# Altium PCB 24V-10A-Power-Board-v1.0.PcbDoc (part 3 of 5)
Units mil, origin at the board's own origin, x right, y up, seen from the top; angles counter-clockwise.
Board outline 6000 x 4000 mil, 2 copper layers (Top Layer, Bottom Layer); 609 components, 307 nets, 1491 pads, 0 vias.
Unrouted connection lines stored in the file: 1132.
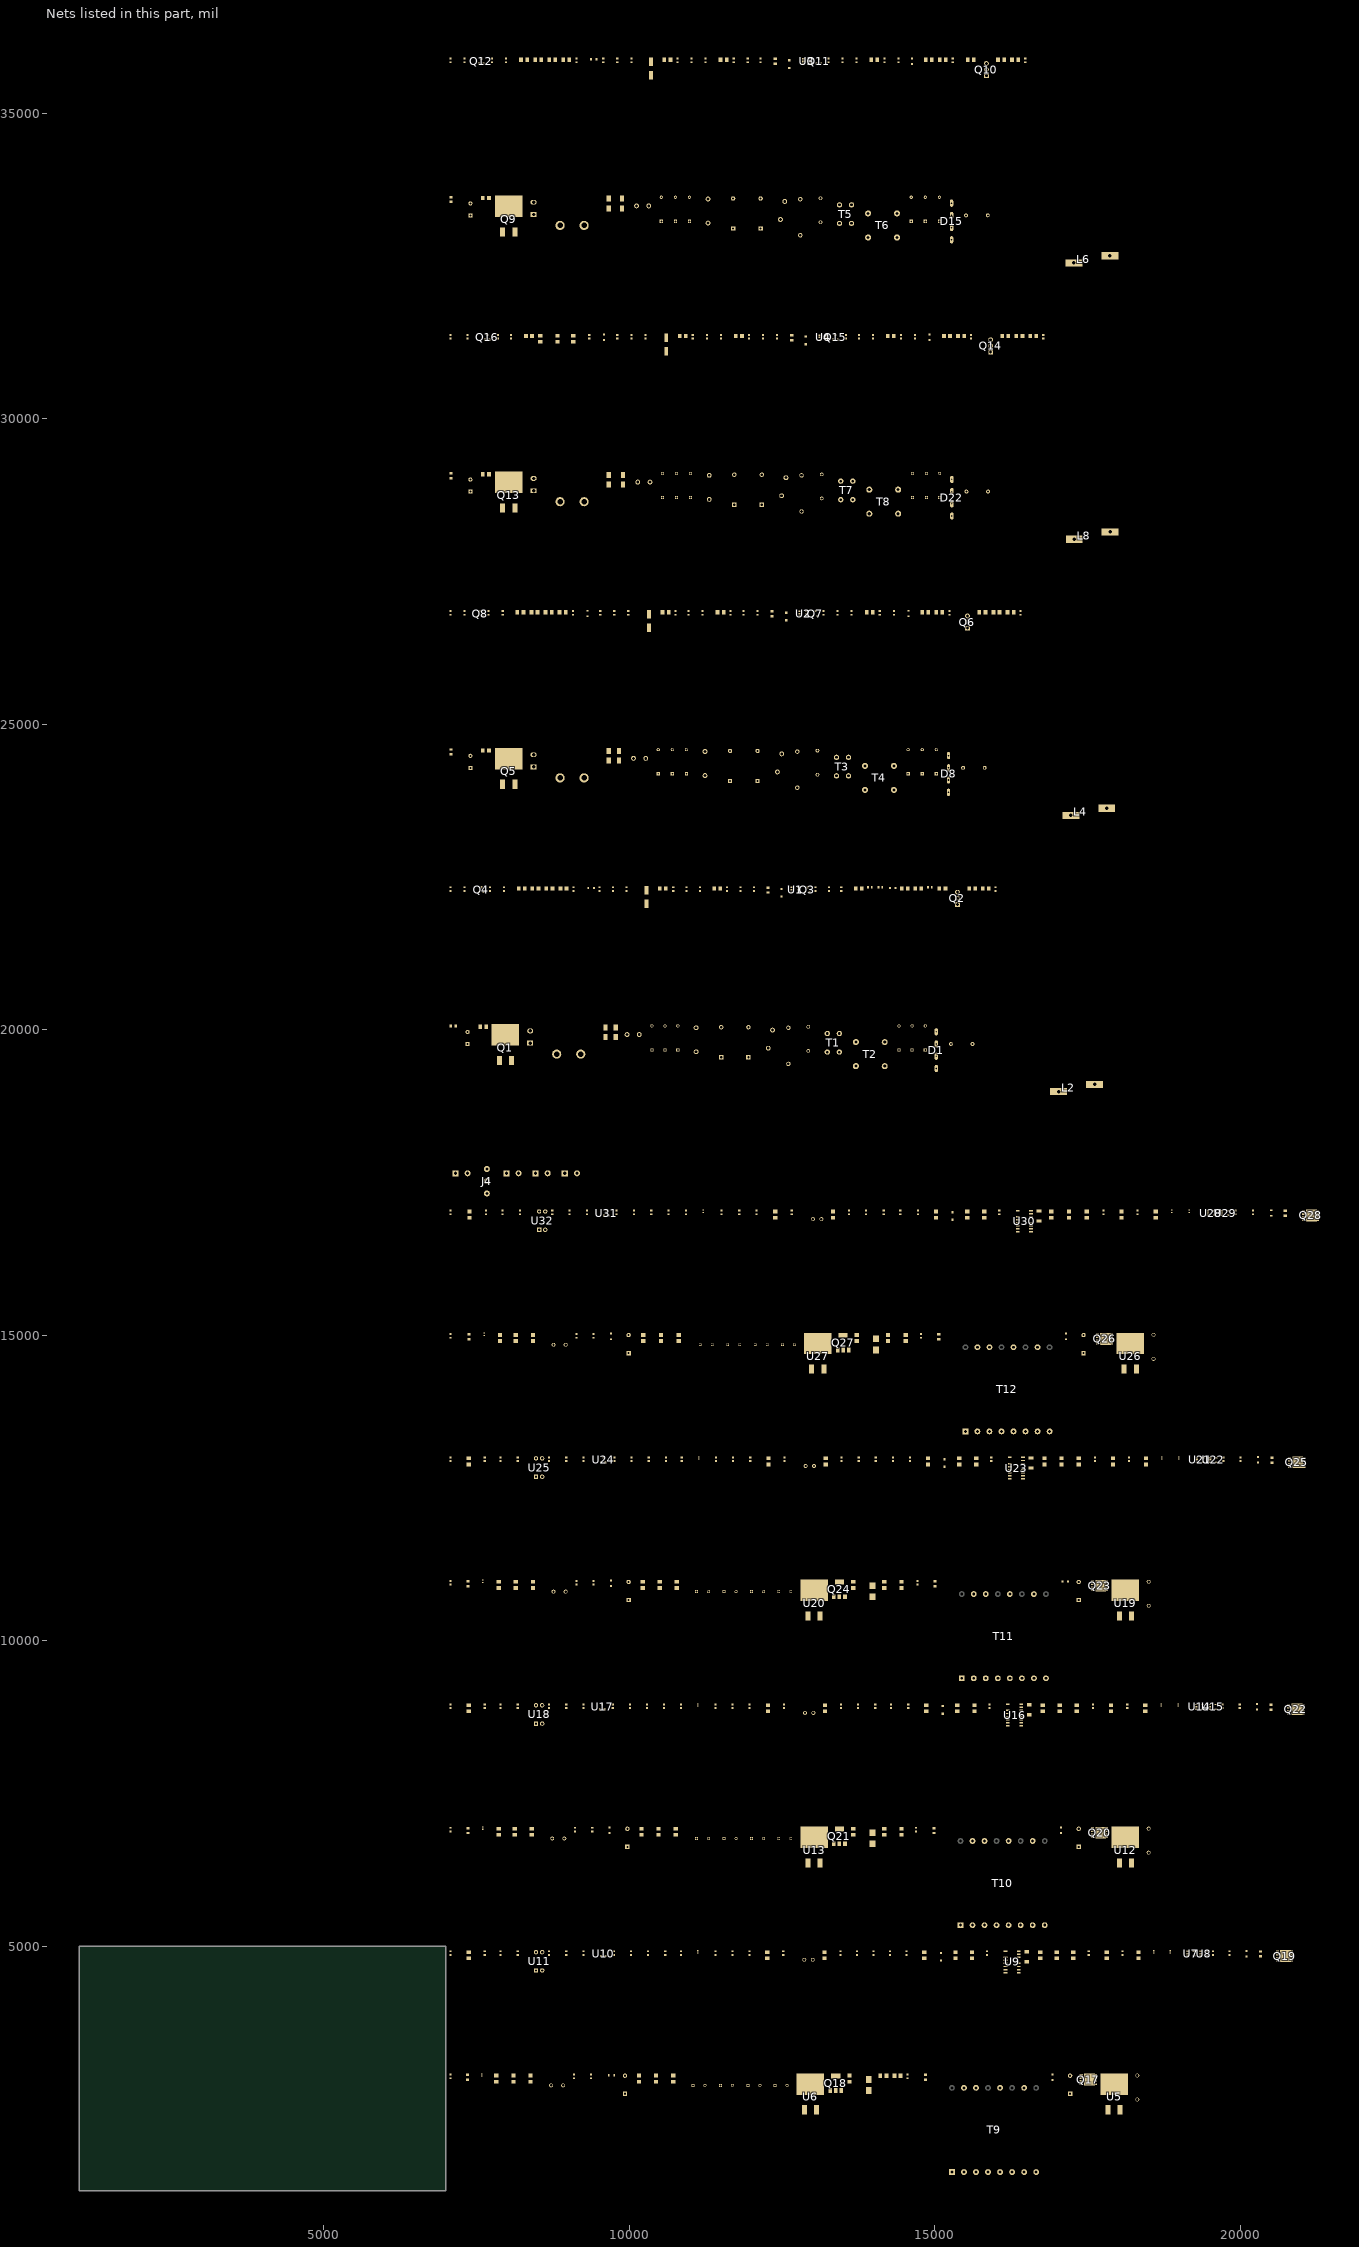
[diagram p2: the nets of this part, all layers, seen from the top]

## Part data (continued)
D4 D11 D18 D25: "DIODE GEN PURP 600V 8A TO220FPAC", LCSC Part Number=C77956, Manufacturer=STMicroelectronics, ComponentLink1Description=https://datasheet.ciiva.com/4455/cd00002721-110256-4455363.pdf?src-supplier=Mouser, ComponentLink1URL=https://datasheet.ciiva.com/4455/cd00002721-110256-4455363.pdf?src-supplier=Mouser, ComponentLink2Description=https://datasheet.ciiva.com/7964/1522573-7964086.pdf?src-supplier=Element14, ComponentLink2URL=https://datasheet.ciiva.com/7964/1522573-7964086.pdf?src-supplier=Element14, ComponentLink3Description=https://datasheet.ciiva.com/917/cd00002721-917751.pdf?src-supplier=Digikey, ComponentLink3URL=https://datasheet.ciiva.com/917/cd00002721-917751.pdf?src-supplier=Digikey, ComponentLink4Description=https://datasheet.ciiva.com/14169/cd00002721-14169005.pdf?src-supplier=Distrelec, ComponentLink4URL=https://datasheet.ciiva.com/14169/cd00002721-14169005.pdf?src-supplier=Distrelec, Item Type=Diode, Manufacturer Part Number=STTH8L06FP, Pricing="1=0.8, 10=0.793, 50=0.793, 100=0.793, 1000=0.673, 10000=0.377 (USD)", RoHS=Yes, Stock=2675, Supplier=Mouser
D5 D7 D12 D14 D19 D21 D26 D28 D29 D31 D35 D37 D41 D43 D47 D49: "100V 1V@10mA 4ns 200mA SOD-323 Switching Diodes ROHS", LCSC Part Number=C668970, Manufacturer=MCC, ComponentLink1Description=https://datasheet.ciiva.com/6367/mmdl914sod-323-6367364.pdf?src-supplier=Digikey, ComponentLink1URL=https://datasheet.ciiva.com/6367/mmdl914sod-323-6367364.pdf?src-supplier=Digikey, ComponentLink2Description=https://datasheet.ciiva.com/24097/mmdl914sod-323-24097719.pdf?src-supplier=Mouser, ComponentLink2URL=https://datasheet.ciiva.com/24097/mmdl914sod-323-24097719.pdf?src-supplier=Mouser, ComponentLink3Description=https://datasheet.ciiva.com/6367/mmdl914sod-323-6367366.pdf?src-supplier=Digikey, ComponentLink3URL=https://datasheet.ciiva.com/6367/mmdl914sod-323-6367366.pdf?src-supplier=Digikey, ComponentLink4Description=https://datasheet.ciiva.com/6367/mmdl914sod-323-6367368.pdf?src-supplier=Digikey, ComponentLink4URL=https://datasheet.ciiva.com/6367/mmdl914sod-323-6367368.pdf?src-supplier=Digikey, Item Type=Diode, Manufacturer Part Number=MMDL914-TP, Pricing="1=0.15, 10=0.108, 100=0.0585, 500=0.04594, 1000=0.03191 (USD)", RoHS=Yes, Stock=172971, Supplier=Digikey
D6 D13 D20 D27: "100V 400mW Single 1.25V@150mA 8ns 300mA SOD-123 Switching Diode ROHS", LCSC Part Number=C917030, Manufacturer=JSMSEMI, Package=SOD-123, ComponentLink1Description=LCSC, ComponentLink1URL=https://www.lcsc.com/product-detail/Switching-Diode_JSMSEMI-1N4148W_C917030.html, Item Type=Diode, Manufacturer Part Number=1N4148W
D30 D36 D42 D48: "DIODE SCHOTTKY 60V 1A SMB", Average Rectified Current=1A, Case/Package=SMB, LCSC Part Number=C5268303, Manufacturer=STMicroelectronics, Max Reverse Voltage (DC)=60V, Package Quantity=1, ComponentLink1Description=https://datasheet.ciiva.com/6380/dm00058656-6380741.pdf?src-supplier=Digikey, ComponentLink1URL=https://datasheet.ciiva.com/6380/dm00058656-6380741.pdf?src-supplier=Digikey, Item Type=Diode, Manufacturer Part Number=STPS160UY, Mounting Technology="Surface Mount", Packaging="Tape and Reel", Pricing="1=0.46, 10=0.458, 50=0.458, 100=0.458, 1000=0.314, 10000=0.107 (USD)", RoHS=Yes, RoHS Compliant=Yes, Series=-, Stock=2181, Supplier=Mouser
D32 D38 D44 D50: "19V~21V 200mW 20V SOD-323-2 Zener Diodes ROHS", LCSC Part Number=C508233, Manufacturer=Diodes, ComponentLink1Description=https://datasheet.ciiva.com/896/ds31038-896169.pdf?src-supplier=Digikey, ComponentLink1URL=https://datasheet.ciiva.com/896/ds31038-896169.pdf?src-supplier=Digikey, ComponentLink2Description=https://datasheet.ciiva.com/896/ds31038-896170.pdf?src-supplier=Digikey, ComponentLink2URL=https://datasheet.ciiva.com/896/ds31038-896170.pdf?src-supplier=Digikey, ComponentLink3Description=https://datasheet.ciiva.com/896/ds31038-896171.pdf?src-supplier=Digikey, ComponentLink3URL=https://datasheet.ciiva.com/896/ds31038-896171.pdf?src-supplier=Digikey, ComponentLink4Description=https://datasheet.ciiva.com/10640/ds31038-10640197.pdf?src-supplier=Avnet, ComponentLink4URL=https://datasheet.ciiva.com/10640/ds31038-10640197.pdf?src-supplier=Avnet, Item Type=Diode, Manufacturer Part Number=MMSZ5250BS-7-F, Pricing="3000=0.0292, 9000=0.0281, 15000=0.0276, 60000=0.0263, 90000=0.0255 (USD)", RoHS=Yes, Stock=3000, Supplier="Future Electronics"
D33 D39 D45 D51: "DIODE GEN PURP 600V 1A DO214AD", Forward Current=1A, LCSC Part Number=C896698, Manufacturer="ON Semiconductor / Fairchild", Max Reverse Current=1uA, Reverse Voltage=600V, ComponentLink1Description=http://www.farnell.com/datasheets/2572314.pdf?src-supplier=Farnell, ComponentLink1URL=http://www.farnell.com/datasheets/2572314.pdf?src-supplier=Farnell, ComponentLink2Description=http://www.farnell.com/datasheets/2572314.pdf?src-supplier=Newark, ComponentLink2URL=http://www.farnell.com/datasheets/2572314.pdf?src-supplier=Newark, ComponentLink3Description=http://www.farnell.com/datasheets/2572314.pdf?src-supplier=Element14, ComponentLink3URL=http://www.farnell.com/datasheets/2572314.pdf?src-supplier=Element14, ComponentLink4Description=https://www.onsemi.com/pub/Collateral/ES1JAF-D.PDF?src-supplier=Digikey, ComponentLink4URL=https://www.onsemi.com/pub/Collateral/ES1JAF-D.PDF?src-supplier=Digikey, ComponentLink5Description=https://www.fairchildsemi.com/datasheets/ES/ES1DAF.pdf?src-supplier=Digikey, ComponentLink5URL=https://www.fairchildsemi.com/datasheets/ES/ES1DAF.pdf?src-supplier=Digikey, Height=1.1mm, Item Type=Diode, Manufacturer Part Number=ES1JAF, Pricing="1=0.66, 10=0.443, 100=0.3026, 500=0.23836, 1000=0.21716, 2000=0.19913, 5000=0.17939 (USD)", RoHS=Yes, Stock=35994, Supplier=Digikey
D34 D40 D46 D52: "DIODE GEN PURP 100V 300MA SOD123", Average Rectified Current=300mA, Current Rating=150mA, Forward Voltage=1.25V, LCSC Part Number=C83528, Manufacturer=Diodes, Max Forward Surge Current (Ifsm)=2A, Max Operating Temperature=150°C, Max Repetitive Reverse Voltage (Vrrm)=100V, Max Reverse Current=1uA, Min Operating Temperature=-65°C, Package Quantity=3000, Power Dissipation=400mW, Supplier Part Number 1=7634694, Voltage Rating (DC)=75V, Category="Rectifier Diodes", ComponentLink1Description=https://datasheet.ciiva.com/1179/1915529-1179304.pdf?src-supplier=Element14, ComponentLink1URL=https://datasheet.ciiva.com/1179/1915529-1179304.pdf?src-supplier=Element14, ComponentLink2Description=https://datasheet.ciiva.com/22695/1915529-22695239.pdf?src-supplier=Element14, ComponentLink2URL=https://datasheet.ciiva.com/22695/1915529-22695239.pdf?src-supplier=Element14, ComponentLink3Description=https://datasheet.ciiva.com/8300/ds30086-8300392.pdf?src-supplier=Avnet, ComponentLink3URL=https://datasheet.ciiva.com/8300/ds30086-8300392.pdf?src-supplier=Avnet, ComponentLink4Description=https://datasheet.ciiva.com/15219/getdatasheetpartid-110030-15219548.pdf?src-supplier=Verical, ComponentLink4URL=https://datasheet.ciiva.com/15219/getdatasheetpartid-110030-15219548.pdf?src-supplier=Verical, ComponentLink5Description=https://datasheet.ciiva.com/8303/ds30086-8303197.pdf?src-supplier=Avnet, ComponentLink5URL=https://datasheet.ciiva.com/8303/ds30086-8303197.pdf?src-supplier=Avnet, ComponentLink6Description=https://datasheet.ciiva.com/911/ds30086-911735.pdf?src-supplier=Digi-Key, ComponentLink6URL=https://datasheet.ciiva.com/911/ds30086-911735.pdf?src-supplier=Digi-Key, ComponentLink7Description=https://datasheet.ciiva.com/911/ds30086-911736.pdf?src-supplier=Digi-Key, ComponentLink7URL=https://datasheet.ciiva.com/911/ds30086-911736.pdf?src-supplier=Digi-Key, ComponentLink8Description=https://datasheet.ciiva.com/911/ds30086-911734.pdf?src-supplier=Digi-Key, ComponentLink8URL=https://datasheet.ciiva.com/911/ds30086-911734.pdf?src-supplier=Digi-Key, ComponentLink9Description=https://datasheet.ciiva.com/4435/ds30086-4435128.pdf?src-supplier=Mouser, ComponentLink9URL=https://datasheet.ciiva.com/4435/ds30086-4435128.pdf?src-supplier=Mouser, Contact Plating=Tin,Matte, Element Configuration=Single, Forward Current=150mA, Height=1.25mm, Item Type=Diode, Lead Free="Lead Free", Length=2.85mm, Manufacturer Part Number=1N4148W-7-F, Max Reverse Voltage (DC)=100V, Max Surge Current=2A, Mounting Technology="Surface Mount", Output Current=150mA, Packaging="Tape and Reel", Peak Non-Repetitive Surge Current=2A, Pins=2, Polarity=Standard, Power Rating=400mW, Pricing 1="3000=0.01840, 12000=0.01760, 45000=0.01690, 120000=0.01640, 300000=0.01560 (USD)", Radiation Hardening=No, Reach SVHC Compliant=Yes, Recovery Time=4ns, Reverse Recovery Time=4ns, Reverse Recovery Time-Max=4ns, RoHS=Yes, RoHS Compliant=Yes, Series=-, Stock 1=32931000, Supplier 1="Future Electronics", Voltage=100V, Weight=0.000353oz, Width=1.7mm
F1: library part 37215000001, "FUSE BOARD MNT 5A 250VAC RADIAL", LCSC Part Number=C142820, Manufacturer="Littelfuse Wickmann", ComponentLink1Description=https://datasheet.ciiva.com/299/littelfuse-fuse-372-299190.pdf?src-supplier=Digikey, ComponentLink1URL=https://datasheet.ciiva.com/299/littelfuse-fuse-372-299190.pdf?src-supplier=Digikey, ComponentLink2Description=https://datasheet.ciiva.com/16298/littelfuse-fuse-372-16298798.pdf?src-supplier=Future+Electronics, ComponentLink2URL=https://datasheet.ciiva.com/16298/littelfuse-fuse-372-16298798.pdf?src-supplier=Future+Electronics, Item Type=Fuses, Manufacturer Part Number=37215000001, Pricing="1=0.96, 5=0.928, 10=0.869, 50=0.7192, 100=0.5993, 250=0.58436, 500=0.49446 (USD)", RoHS=Yes, Stock=2122, Supplier=Digikey
F2 F3 F4: "FUSE BOARD MNT 5A 250VAC RADIAL", LCSC Part Number=C142820, Manufacturer="Littelfuse Wickmann", ComponentLink1Description=https://datasheet.ciiva.com/299/littelfuse-fuse-372-299190.pdf?src-supplier=Digikey, ComponentLink1URL=https://datasheet.ciiva.com/299/littelfuse-fuse-372-299190.pdf?src-supplier=Digikey, ComponentLink2Description=https://datasheet.ciiva.com/16298/littelfuse-fuse-372-16298798.pdf?src-supplier=Future+Electronics, ComponentLink2URL=https://datasheet.ciiva.com/16298/littelfuse-fuse-372-16298798.pdf?src-supplier=Future+Electronics, Item Type=Fuses, Manufacturer Part Number=37215000001, Pricing="1=0.96, 5=0.928, 10=0.869, 50=0.7192, 100=0.5993, 250=0.58436, 500=0.49446 (USD)", RoHS=Yes, Stock=2122, Supplier=Digikey
J1 J2 J3 J5: "1x2P 5.08mm 2.5 1 2 18A -40℃~+105℃ 250V Green 14~30 Direct Insert Plugin,P=5.08mm Screw Terminal Blocks ROHS", LCSC Part Number=C8465, Manufacturer=Kangnex, Item Type="Terminal Block", Manufacturer Part Number=WJ500V-5.08-2P, RoHS=No
J4: "1x3P 18A -40℃~+105℃ 250V Green 14~30 Straight pin 5.08mm 2.5 1 3 Plugin,P=5.08mm Screw terminal ROHS", LCSC Part Number=C72334, Manufacturer="Ningbo Kangnex Elec", Package=Plugin,P=5.08mm, ComponentLink1Description=LCSC, ComponentLink1URL=https://www.lcsc.com/product-detail/Screw-terminal_Ningbo-Kangnex-Elec-WJ500V-5-08-3P_C72334.html, Item Type="Terminal Block", Manufacturer Part Number=WJ500V-5.08-3P
L1 L3 L5 L7: library part 7447021, "FIXED IND 100UH 2A 80 MOHM TH", Manufacturer="Wurth Electronics", Supplier Part Number=710-7447021, ComponentLink1Description=https://datasheet.ciiva.com/11796/0900766b804e2e89-11796539.pdf?src-supplier=Rs, ComponentLink1URL=https://datasheet.ciiva.com/11796/0900766b804e2e89-11796539.pdf?src-supplier=Rs, ComponentLink2Description=https://datasheet.ciiva.com/6693/7447021-6693538.pdf?src-supplier=Digikey, ComponentLink2URL=https://datasheet.ciiva.com/6693/7447021-6693538.pdf?src-supplier=Digikey, ComponentLink3Description=https://datasheet.ciiva.com/14101/pk7447021-data-de-14101850.pdf?src-supplier=Distrelec, ComponentLink3URL=https://datasheet.ciiva.com/14101/pk7447021-data-de-14101850.pdf?src-supplier=Distrelec, ComponentLink4Description=https://datasheet.ciiva.com/7695/7447021-7695676.pdf?src-supplier=Element14, ComponentLink4URL=https://datasheet.ciiva.com/7695/7447021-7695676.pdf?src-supplier=Element14, ComponentLink5Description=https://datasheet.ciiva.com/48691/001087627-da-01-ml-we-fi-funkentstoerdrossel-7447021-de-en-48691575.pdf?src-supplier=Conrad, ComponentLink5URL=https://datasheet.ciiva.com/48691/001087627-da-01-ml-we-fi-funkentstoerdrossel-7447021-de-en-48691575.pdf?src-supplier=Conrad, Item Type=Inductors, Manufacturer Part Number=7447021, Pricing="1=1.93, 10=1.83, 50=1.71, 100=1.61, 1000=1.46, 10000=1.46 (USD)", RoHS=Yes, Stock=1392, Supplier=Mouser
L2 L4 L6 L8: library part 760801401, "FIXED IND 118UH 13.9A 0.022OHM", Manufacturer="Wurth Electronics", Supplier Part Number=732-760801401-ND, Item Type=Inductors, Manufacturer Part Number=760801401, Pricing="1=18.9, 5=17.01, 10=15.12, 20=14.175, 100=13.2301 (USD)", RoHS=No, Stock=36, Supplier=Digikey
NT1 NT2 NT3 NT4: "Net Tie SMD", Manufacturer Part Number="Net Tie", Item Type="Net Tie Pad"
Q1 Q5 Q9 Q13: "MOSFET N-CH 600V 20A D2PAK", LCSC Part Number=C2688646, Manufacturer=STMicroelectronics, ComponentLink1Description=https://datasheet.ciiva.com/25625/0900766b810ea17c-25625320.pdf?src-supplier=Rs, ComponentLink1URL=https://datasheet.ciiva.com/25625/0900766b810ea17c-25625320.pdf?src-supplier=Rs, ComponentLink2Description=https://datasheet.ciiva.com/6368/cd00232934-6368742.pdf?src-supplier=Digikey, ComponentLink2URL=https://datasheet.ciiva.com/6368/cd00232934-6368742.pdf?src-supplier=Digikey, ComponentLink3Description=https://datasheet.ciiva.com/6368/cd00232934-6368743.pdf?src-supplier=Digikey, ComponentLink3URL=https://datasheet.ciiva.com/6368/cd00232934-6368743.pdf?src-supplier=Digikey, ComponentLink4Description=https://datasheet.ciiva.com/940/cd00232934-940186.pdf?src-supplier=Digikey, ComponentLink4URL=https://datasheet.ciiva.com/940/cd00232934-940186.pdf?src-supplier=Digikey, ComponentLink5Description=https://datasheet.ciiva.com/16490/cd00232934-16490237.pdf?src-supplier=Future+Electronics, ComponentLink5URL=https://datasheet.ciiva.com/16490/cd00232934-16490237.pdf?src-supplier=Future+Electronics, Item Type=MOSFETs, Manufacturer Part Number=STB26NM60N, Pricing="1=5.74, 10=3.91, 50=3.91, 100=3.5, 1000=3.49, 10000=3.49 (USD)", RoHS=Yes, Stock=642, Supplier=Mouser
Q2 Q6 Q10 Q14: "MOSFET N-CH 600V 22A TO220-3", LCSC Part Number=C537192, Manufacturer=Infineon, ComponentLink1Description=http://www.mouser.com/ds/2/196/Infineon-IPP60R099C7-DS-v02_00-EN-1076845.pdf?src-supplier=Mouser, ComponentLink1URL=http://www.mouser.com/ds/2/196/Infineon-IPP60R099C7-DS-v02_00-EN-1076845.pdf?src-supplier=Mouser, ComponentLink2Description=https://www.infineon.com/dgdl/Infineon-IPP60R099C7-DS-v02_00-EN.pdf?fileId=5546d4624cb7f111014d481216877004&src-supplier=Digikey, ComponentLink2URL=https://www.infineon.com/dgdl/Infineon-IPP60R099C7-DS-v02_00-EN.pdf?fileId=5546d4624cb7f111014d481216877004&src-supplier=Digikey, Item Type=MOSFETs, Manufacturer Part Number=IPP60R099C7XKSA1, Pricing="1=5.39, 10=4.84, 50=4.78, 100=4.69, 1000=2.27, 10000=2.27 (USD)", RoHS=Yes, Stock=617, Supplier=Mouser
Q3 Q7 Q11 Q15: "MOSFET P-CH 60V 1.6A SOT23-3", Case/Package=SOT-23-3, Continuous Drain Current (ID)=1.2A, Drain to Source Resistance=345mR, Drain to Source Voltage (Vdss)=60V, Gate to Source Voltage (Vgs)=20V, Input Capacitance=210pF, LCSC Part Number=C553975, Manufacturer="Vishay Siliconix", Max Operating Temperature=150°C, Max Power Dissipation=1.7W, Min Operating Temperature=-55°C, Package Quantity=3000, Power Dissipation=1W, Threshold Voltage=-1V, ComponentLink1Description=https://datasheet.ciiva.com/16217/si2309cd-16217597.pdf?src-supplier=Future+Electronics, ComponentLink1URL=https://datasheet.ciiva.com/16217/si2309cd-16217597.pdf?src-supplier=Future+Electronics, ComponentLink2Description=https://datasheet.ciiva.com/29742/si2309cd-29742879.pdf?src-supplier=Digikey, ComponentLink2URL=https://datasheet.ciiva.com/29742/si2309cd-29742879.pdf?src-supplier=Digikey, Drain-source On Resistance-Max=345mR, Fall Time=35ns, Height=1.02mm, Item Type=MOSFETs, Lead Free="Lead Free", Length=3.04mm, Manufacturer Part Number=SI2309CDS-T1-E3, Mounting Technology="Surface Mount", Number of Channels=1, Packaging="Tape and Reel", Pins=3, Polarity=P-CHANNEL, Pricing="1=0.53, 10=0.453, 50=0.453, 100=0.316, 1000=0.2, 10000=0.157 (USD)", Radiation Hardening=No, Rds On Max=345mR, Rise Time=35ns, RoHS=Yes, RoHS Compliant=Yes, Series=TrenchFET®, Stock=57582, Supplier=Mouser, Turn-Off Delay Time=15ns, Turn-On Delay Time=40ns, Weight=0.050717oz, Width=1.4mm
Q4 Q8 Q12 Q16: "TRANS NPN 40V 0.6A SOT23-3", LCSC Part Number=C151826, Manufacturer=Diodes, ComponentLink1Description=https://datasheet.ciiva.com/15139/getdatasheetpartid-91436-15139165.pdf?src-supplier=Verical, ComponentLink1URL=https://datasheet.ciiva.com/15139/getdatasheetpartid-91436-15139165.pdf?src-supplier=Verical, ComponentLink2Description=https://datasheet.ciiva.com/972/ds30039-972547.pdf?src-supplier=Digikey, ComponentLink2URL=https://datasheet.ciiva.com/972/ds30039-972547.pdf?src-supplier=Digikey, ComponentLink3Description=https://datasheet.ciiva.com/972/ds30039-972548.pdf?src-supplier=Digikey, ComponentLink3URL=https://datasheet.ciiva.com/972/ds30039-972548.pdf?src-supplier=Digikey, ComponentLink4Description=https://datasheet.ciiva.com/972/ds30039-972549.pdf?src-supplier=Digikey, ComponentLink4URL=https://datasheet.ciiva.com/972/ds30039-972549.pdf?src-supplier=Digikey, ComponentLink5Description=https://datasheet.ciiva.com/11201/ds30039-11201820.pdf?src-supplier=Avnet, ComponentLink5URL=https://datasheet.ciiva.com/11201/ds30039-11201820.pdf?src-supplier=Avnet, ComponentLink6Description=https://datasheet.ciiva.com/16199/ds30039-16199054.pdf?src-supplier=Future+Electronics, ComponentLink6URL=https://datasheet.ciiva.com/16199/ds30039-16199054.pdf?src-supplier=Future+Electronics, Item Type=BJTs, Manufacturer Part Number=MMBT4401-7-F, Pricing="3000=0.0119, 12000=0.0113, 30000=0.011, 75000=0.0107, 120000=0.0102 (USD)", RoHS=Yes, Stock=1359000, Supplier="Future Electronics"
Q17 Q19 Q20 Q22 Q23 Q25 Q26 Q28: "MOSFET N-CH 80V 100A 8VSON", LCSC Part Number=C2864118, Manufacturer="Texas Instruments", Package="8-VSON-CLIP (5x6)", ComponentLink1Description=LCSC, ComponentLink1URL=https://jlcpcb.com/partdetail/TexasInstruments-CSD19502Q5B/C2864118, Item Type=Mosfet, Manufacturer Part Number=CSD19502Q5B
Q18 Q21 Q24 Q27: "TRANS NPN 60V 3A SOT223-3", Case/Package=SOT-223, Clock Frequency=175MHz, Collector Base Voltage (VCBO)=80V, Collector Emitter Breakdown Voltage=60V, Collector Emitter Saturation Voltage=430mV, Collector-emitter Voltage-Max=600mV, Continuous Collector Current=3A, Emitter Base Voltage (VEBO)=5V, LCSC Part Number=C24098, Manufacturer="Diodes Zetex", Max Operating Temperature=150°C, Max Power Dissipation=2W, Min Operating Temperature=-55°C, Package Quantity=1, Collector Emitter Voltage (VCEO)=60V, ComponentLink1Description=https://datasheet.ciiva.com/5782/73067-5782650.pdf?src-supplier=Farnell, ComponentLink1URL=https://datasheet.ciiva.com/5782/73067-5782650.pdf?src-supplier=Farnell, ComponentLink2Description=https://datasheet.ciiva.com/8029/73067-8029643.pdf?src-supplier=Element14, ComponentLink2URL=https://datasheet.ciiva.com/8029/73067-8029643.pdf?src-supplier=Element14, ComponentLink3Description=https://datasheet.ciiva.com/4723/fzt651-4723319.pdf?src-supplier=Mouser, ComponentLink3URL=https://datasheet.ciiva.com/4723/fzt651-4723319.pdf?src-supplier=Mouser, ComponentLink4Description=https://datasheet.ciiva.com/975/fzt651-975544.pdf?src-supplier=Digikey, ComponentLink4URL=https://datasheet.ciiva.com/975/fzt651-975544.pdf?src-supplier=Digikey, Current=3A, Current Rating=3A, Frequency=175MHz, Gain Bandwidth Product=175MHz, Height=1.65mm, hFE Min=100, Item Type=BJTs, Lead Free="Lead Free", Length=6.7mm, Manufacturer Part Number=FZT651TA, Max Breakdown Voltage=60V, Max Collector Current=3A, Mounting Technology="Surface Mount", Number of Elements=1, Packaging="Tape and Reel", Pins=4, Polarity=NPN, Power Dissipation=2W, Pricing="1000=0.265, 3000=0.255, 4000=0.25, 10000=0.245, 15000=0.24 (USD)", Radiation Hardening=No, Reach SVHC Compliant=No, RoHS=Yes, RoHS Compliant=Yes, Series=-, Stock=670000, Supplier="Future Electronics", Termination=SMD/SMT, Transition Frequency=175MHz, Voltage=60V, Voltage Rating (DC)=60V, Weight=0.000282oz, Width=3.7mm
R1 R4 R27 R30 R53 R56 R79 R82: library part RC1206FR-073M09L, "RES 3.09M OHM 1% 1/4W 1206", Case Code (Imperial)=1206, Case Code (Metric)=3216, LCSC Part Number=C488771, Manufacturer=Yageo, Max Operating Temperature=155°C, Max Power Dissipation=250mW, Min Operating Temperature=-55°C, Package Quantity=1, Temperature Coefficient=100ppm/°C, Tolerance=1%, Voltage Rating (DC)=200V, Case/Package=1206, ComponentLink1Description=https://datasheet.ciiva.com/2461/pyu-rc1206-51-rohs-l-4-2461290.pdf?src-supplier=Digikey, ComponentLink1URL=https://datasheet.ciiva.com/2461/pyu-rc1206-51-rohs-l-4-2461290.pdf?src-supplier=Digikey, ComponentLink2Description=https://datasheet.ciiva.com/2461/pyu-rc1206-51-rohs-l-4-2461291.pdf?src-supplier=Digikey, ComponentLink2URL=https://datasheet.ciiva.com/2461/pyu-rc1206-51-rohs-l-4-2461291.pdf?src-supplier=Digikey, ComponentLink3Description=https://datasheet.ciiva.com/2461/pyu-rc1206-51-rohs-l-4-2461292.pdf?src-supplier=Digikey, ComponentLink3URL=https://datasheet.ciiva.com/2461/pyu-rc1206-51-rohs-l-4-2461292.pdf?src-supplier=Digikey, Contact Plating=Tin,Matte, Features="Moisture Resistant", Height=0.026inch, Item Type=Resistor, Lead Free="Lead Free", Length=0.122inch, Manufacturer Part Number=RC1206FR-073M09L, Number of Terminations=2, Packaging="Cut Tape", Pricing="1=0.1, 10=0.025, 50=0.025, 100=0.015, 1000=0.013, 10000=0.01 (USD)", RoHS=Yes, RoHS Compliant=Yes, Series=RC, Stock=10394, Supplier=Mouser, Width=0.063inch
R2 R28 R54 R80: library part RC0805FR-071ML, "RES 1M OHM 1% 1/8W 0805", Case Code (Imperial)=0805, Case Code (Metric)=2012, Case/Package=Molded, LCSC Part Number=C107700, Manufacturer=Yageo, Max Operating Temperature=155°C, Min Operating Temperature=-55°C, Power Rating=125mW, Resistance Tolerance=1%, Resistor Type="Thick Film", Supplier Part Number=7283393, Temperature Coefficient=250ppm/°C, Voltage Rating=150V, Category="Chip SMD Resistors", Construction=Rectangular, Depth=1.25mm, Item Type=Resistor, Lead Free="Lead Free", Length=2mm, Manufacturer Part Number=RC0805FR-071ML, Military Standard=Not, Packaging="Tape and Reel", Pricing="5000=0.0027, 25000=0.0025, 125000=0.0024, 500000=0.0023, 1250000=0.0021 (USD)", Reach SVHC Compliant=Unknown, RoHS=Yes, RoHS Compliant=Yes, Stock=2655000, Supplier="Future Electronics", Tolerance=1%, Voltage Rating (AC)=150V
R3 R6 R7 R10 R29 R32 R33 R36 R55 R58 R59 R62 R81 R84 R85 R88: library part RC1206FR-073M3L, "RES 3.3M OHM 1% 1/4W 1206", LCSC Part Number=C137288, Manufacturer=Yageo, Voltage Rating (AC)=200V, ComponentLink1Description=https://datasheet.ciiva.com/11809/0900766b80c6630a-11809505.pdf?src-supplier=Rs, ComponentLink1URL=https://datasheet.ciiva.com/11809/0900766b80c6630a-11809505.pdf?src-supplier=Rs, ComponentLink2Description=https://datasheet.ciiva.com/2511/pyu-rc1206-51-rohs-l-4-2511094.pdf?src-supplier=Digikey, ComponentLink2URL=https://datasheet.ciiva.com/2511/pyu-rc1206-51-rohs-l-4-2511094.pdf?src-supplier=Digikey, ComponentLink3Description=https://datasheet.ciiva.com/2511/pyu-rc1206-51-rohs-l-4-2511095.pdf?src-supplier=Digikey, ComponentLink3URL=https://datasheet.ciiva.com/2511/pyu-rc1206-51-rohs-l-4-2511095.pdf?src-supplier=Digikey, ComponentLink4Description=https://datasheet.ciiva.com/2511/pyu-rc1206-51-rohs-l-4-2511096.pdf?src-supplier=Digikey, ComponentLink4URL=https://datasheet.ciiva.com/2511/pyu-rc1206-51-rohs-l-4-2511096.pdf?src-supplier=Digikey, ComponentLink5Description=https://datasheet.ciiva.com/17420/pyu-rc1206-51-rohs-l-4-17420140.pdf?src-supplier=Future+Electronics, ComponentLink5URL=https://datasheet.ciiva.com/17420/pyu-rc1206-51-rohs-l-4-17420140.pdf?src-supplier=Future+Electronics, Item Type=Resistor, Manufacturer Part Number=RC1206FR-073M3L, Pricing="5000=0.0038, 20000=0.0036, 75000=0.0034, 200000=0.0032, 500000=0.003 (USD)", RoHS=Yes, Stock=130000, Supplier="Future Electronics"
R5 R31 R57 R83 R105 R110 R135 R140 R165 R170 R195 R200: library part CRCW060310R0FKEA, "RES SMD 10 OHM 1% 1/10W 0603", Case Code (Imperial)=0603, Case Code (Metric)=1608, LCSC Part Number=C844919, Manufacturer=Vishay, Max Operating Temperature=155°C, Max Power Dissipation=100mW, Min Operating Temperature=-55°C, Package Quantity=10, Resistance Tolerance=1%, Resistor Type="Thick Film", Temperature Coefficient=100ppm/°C, Voltage Rating=75V, Case/Package=0603, ComponentLink1Description=https://datasheet.ciiva.com/11808/0900766b80d98afc-11808660.pdf?src-supplier=Rs, ComponentLink1URL=https://datasheet.ciiva.com/11808/0900766b80d98afc-11808660.pdf?src-supplier=Rs, ComponentLink2Description=https://datasheet.ciiva.com/26316/fld-crcw-e3-data-en-26316582.pdf?src-supplier=Distrelec, ComponentLink2URL=https://datasheet.ciiva.com/26316/fld-crcw-e3-data-en-26316582.pdf?src-supplier=Distrelec, ComponentLink3Description=https://datasheet.ciiva.com/2465/dcrcwe3-2465700.pdf?src-supplier=Digikey, ComponentLink3URL=https://datasheet.ciiva.com/2465/dcrcwe3-2465700.pdf?src-supplier=Digikey, ComponentLink4Description=https://datasheet.ciiva.com/16781/70201119-16781847.pdf?src-supplier=Allied+Electronics, ComponentLink4URL=https://datasheet.ciiva.com/16781/70201119-16781847.pdf?src-supplier=Allied+Electronics, ComponentLink5Description=https://datasheet.ciiva.com/22673/1697337-22673071.pdf?src-supplier=Element14, ComponentLink5URL=https://datasheet.ciiva.com/22673/1697337-22673071.pdf?src-supplier=Element14, ComponentLink6Description=https://datasheet.ciiva.com/2465/dcrcwe3-2465701.pdf?src-supplier=Digikey, ComponentLink6URL=https://datasheet.ciiva.com/2465/dcrcwe3-2465701.pdf?src-supplier=Digikey, ComponentLink7Description=https://datasheet.ciiva.com/2465/dcrcwe3-2465699.pdf?src-supplier=Digikey, ComponentLink7URL=https://datasheet.ciiva.com/2465/dcrcwe3-2465699.pdf?src-supplier=Digikey, ComponentLink8Description=https://datasheet.ciiva.com/5547/dcrcwe3-109170-5547342.pdf?src-supplier=Mouser, ComponentLink8URL=https://datasheet.ciiva.com/5547/dcrcwe3-109170-5547342.pdf?src-supplier=Mouser, Construction=Rectangular, Contact Plating=Tin, Depth=0.85mm, Features="Automotive AEC-Q200", Height=0.45mm, Item Type=Resistors, Lead Free=5697LeadFree, Length=1.55mm, Manufacturer Part Number=CRCW060310R0FKEA, Military Standard=Not, Number of Terminations=2, Packaging="Tape and Reel", Pins=2, Power Rating=100mW, Pricing="1=0.1, 10=0.017, 50=0.017, 100=0.01, 1000=0.008, 10000=0.005 (USD)", Reach SVHC Compliant=Unknown, RoHS=Yes, RoHS Compliant=Yes, Series=CRCW, Stock=648208, Supplier=Mouser, Technology="THICK FILM", Termination=SMD/SMT, Tolerance=1%, Voltage Rating (DC)=75V, Weight=7.1E-05oz, Width=0.033inch
R8 R34 R60 R86: library part CRCW06031R00FKEA, "RES SMD 1 OHM 1% 1/10W 0603", Case Code (Imperial)=0603, Case Code (Metric)=1608, LCSC Part Number=C844752, Manufacturer="Vishay Dale", Max Operating Temperature=155°C, Max Power Dissipation=100mW, Min Operating Temperature=-55°C, Package Quantity=5000, Ratings=AEC-Q200, Resistance Tolerance=1%, Resistor Type="Thick Film", Temperature Coefficient=100ppm/°C, Voltage Rating=75V, Case/Package=0603, ComponentLink1Description=https://datasheet.ciiva.com/7792/1359337-7792119.pdf?src-supplier=Element14, ComponentLink1URL=https://datasheet.ciiva.com/7792/1359337-7792119.pdf?src-supplier=Element14, ComponentLink2Description=https://datasheet.ciiva.com/3257/dcrcwe3-3257225.pdf?src-supplier=Avnet, ComponentLink2URL=https://datasheet.ciiva.com/3257/dcrcwe3-3257225.pdf?src-supplier=Avnet, ComponentLink3Description=https://datasheet.ciiva.com/2465/dcrcwe3-2465530.pdf?src-supplier=Digikey, ComponentLink3URL=https://datasheet.ciiva.com/2465/dcrcwe3-2465530.pdf?src-supplier=Digikey, ComponentLink4Description=https://datasheet.ciiva.com/2465/dcrcwe3-2465528.pdf?src-supplier=Digikey, ComponentLink4URL=https://datasheet.ciiva.com/2465/dcrcwe3-2465528.pdf?src-supplier=Digikey, ComponentLink5Description=https://datasheet.ciiva.com/5541/dcrcwe3-109170-5541726.pdf?src-supplier=Mouser, ComponentLink5URL=https://datasheet.ciiva.com/5541/dcrcwe3-109170-5541726.pdf?src-supplier=Mouser, Construction=Rectangular, Contact Plating=Tin, Depth=0.85mm, Features="Automotive AEC-Q200", Height=0.45mm, Item Type=Resistor, Lead Free=5697LeadFree, Length=1.55mm, Manufacturer Part Number=CRCW06031R00FKEA, Military Standard=Not, Number of Terminations=2, Packaging="Tape and Reel", Pins=2, Power Rating=100mW, Pricing="1=0.1, 10=0.024, 50=0.024, 100=0.014, 1000=0.011, 10000=0.006 (USD)", Radiation Hardening=No, Reach SVHC Compliant=Unknown, RoHS=Yes, RoHS Compliant=Yes, Series=CRCW, Stock=303523, Supplier=Mouser, Termination=SMD/SMT, Tolerance=1%, Voltage Rating (DC)=75V, Weight=7.1E-05oz, Width=0.85mm
R9 R35 R61 R87: library part RC0603FR-0782K5L, "RES 82.5K OHM 1% 1/10W 0603", LCSC Part Number=C185310, Manufacturer=Yageo, Voltage Rating (DC)=50V, ComponentLink1Description=https://datasheet.ciiva.com/2519/pyu-r-int-thick-7-2519111.pdf?src-supplier=Digikey, ComponentLink1URL=https://datasheet.ciiva.com/2519/pyu-r-int-thick-7-2519111.pdf?src-supplier=Digikey, ComponentLink2Description=https://datasheet.ciiva.com/2519/pyu-r-int-thick-7-2519112.pdf?src-supplier=Digikey, ComponentLink2URL=https://datasheet.ciiva.com/2519/pyu-r-int-thick-7-2519112.pdf?src-supplier=Digikey, ComponentLink3Description=https://datasheet.ciiva.com/2519/pyu-r-int-thick-7-2519113.pdf?src-supplier=Digikey, ComponentLink3URL=https://datasheet.ciiva.com/2519/pyu-r-int-thick-7-2519113.pdf?src-supplier=Digikey, Item Type=Resistor, Lead Free=5697LeadFree, Manufacturer Part Number=RC0603FR-0782K5L, Pricing="5000=0.00112 (USD)", RoHS=Yes, Stock=165000, Supplier=Avnet
R11 R37 R63 R89: library part RC0603FR-0736K5L, "RES 36.5K OHM 1% 1/10W 0603", LCSC Part Number=C137738, Manufacturer=YAGEO, Package=0603, ComponentLink1Description=LCSC, ComponentLink1URL=https://www.lcsc.com/product-detail/Chip-Resistor-Surface-Mount_YAGEO-RC0603FR-0736K5L_C137738.html, Item Type=Resistor, Manufacturer Part Number=RC0603FR-0736K5L
R12 R38 R64 R90: library part RC0603FR-07120KL, "RES 120K OHM 1% 1/10W 0603", Case Code (Imperial)=0603, Case Code (Metric)=1608, LCSC Part Number=C114607, Manufacturer=Yageo, Max Operating Temperature=155°C, Max Power Dissipation=100mW, Min Operating Temperature=-55°C, Package Quantity=5000, Resistance Tolerance=1%, Resistor Type="Thick Film", Temperature Coefficient=100ppm/°C, Voltage Rating=50V, Working Voltage=75V, Case/Package=0603, ComponentLink1Description=https://datasheet.ciiva.com/11808/0900766b80f96399-11808757.pdf?src-supplier=Rs, ComponentLink1URL=https://datasheet.ciiva.com/11808/0900766b80f96399-11808757.pdf?src-supplier=Rs, ComponentLink2Description=https://datasheet.ciiva.com/2454/pyu-r-int-thick-7-2454739.pdf?src-supplier=Digikey, ComponentLink2URL=https://datasheet.ciiva.com/2454/pyu-r-int-thick-7-2454739.pdf?src-supplier=Digikey, ComponentLink3Description=https://datasheet.ciiva.com/2454/pyu-r-int-thick-7-2454740.pdf?src-supplier=Digikey, ComponentLink3URL=https://datasheet.ciiva.com/2454/pyu-r-int-thick-7-2454740.pdf?src-supplier=Digikey, ComponentLink4Description=https://datasheet.ciiva.com/2454/pyu-r-int-thick-7-2454738.pdf?src-supplier=Digikey, ComponentLink4URL=https://datasheet.ciiva.com/2454/pyu-r-int-thick-7-2454738.pdf?src-supplier=Digikey, ComponentLink5Description=https://datasheet.ciiva.com/7746/443971-7746247.pdf?src-supplier=Element14, ComponentLink5URL=https://datasheet.ciiva.com/7746/443971-7746247.pdf?src-supplier=Element14, ComponentLink6Description=https://datasheet.ciiva.com/7746/443971-7746246.pdf?src-supplier=Element14, ComponentLink6URL=https://datasheet.ciiva.com/7746/443971-7746246.pdf?src-supplier=Element14, Depth=0.8mm, Features="Moisture Resistant", Height=0.022inch, Item Type=Resistors, Lead Free=5697LeadFree, Lead Pitch=2.54mm, Length=0.063inch, Manufacturer Part Number=RC0603FR-07120KL, Number of Terminations=2, Packaging="Tape and Reel", Pins=2, Power Rating=100mW, Pricing="5000=0.0022, 50000=0.0021, 150000=0.0021, 375000=0.002, 1000000=0.0019 (USD)", Radiation Hardening=5898YesNo, Reach SVHC Compliant=Unknown, RoHS=Yes, RoHS Compliant=Yes, Series=RC, Stock=3405000, Supplier="Future Electronics", Technology="THICK FILM", Termination=SMD/SMT, Tolerance=1%, Voltage Rating (AC)=50V, Voltage Rating (DC)=50V, Width=0.031inch
R13 R39 R65 R91: library part RC0603FR-073KL, "RES 3K OHM 1% 1/10W 0603", Case Code (Imperial)=0603, Case Code (Metric)=1608, LCSC Part Number=C126358, Manufacturer=Yageo, Max Operating Temperature=155°C, Max Power Dissipation=100mW, Min Operating Temperature=-55°C, Resistance Tolerance=1%, Resistor Type="Thick Film", Temperature Coefficient=100ppm/°C, Voltage Rating=50V, Case/Package=0603, ComponentLink1Description=http://www.farnell.com/datasheets/2167052.pdf?src-supplier=Farnell, ComponentLink1URL=http://www.farnell.com/datasheets/2167052.pdf?src-supplier=Farnell, ComponentLink2Description=http://www.mouser.com/ds/2/447/RC0603-272842.pdf?src-supplier=Mouser, ComponentLink2URL=http://www.mouser.com/ds/2/447/RC0603-272842.pdf?src-supplier=Mouser, ComponentLink3Description=https://www.verical.com/server-webapp/html/getDatasheet?partID=135099&src-supplier=Verical, ComponentLink3URL=https://www.verical.com/server-webapp/html/getDatasheet?partID=135099&src-supplier=Verical, ComponentLink4Description=http://www.farnell.com/datasheets/2167052.pdf?src-supplier=Element14, ComponentLink4URL=http://www.farnell.com/datasheets/2167052.pdf?src-supplier=Element14, ComponentLink5Description=http://www.yageo.com/documents/recent/PYu-RC_Group_51_RoHS_L_10.pdf?src-supplier=Digikey, ComponentLink5URL=http://www.yageo.com/documents/recent/PYu-RC_Group_51_RoHS_L_10.pdf?src-supplier=Digikey, ComponentLink6Description=http://www.yageo.com/documents/recent/PYu-RC_Group_51_RoHS_L_9.pdf?src-supplier=Digikey, ComponentLink6URL=http://www.yageo.com/documents/recent/PYu-RC_Group_51_RoHS_L_9.pdf?src-supplier=Digikey, ComponentLink7Description=https://datasheet.octopart.com/RC0603FR-073KL-Yageo-datasheet-8328172.pdf?src-supplier=Farnell, ComponentLink7URL=https://datasheet.octopart.com/RC0603FR-073KL-Yageo-datasheet-8328172.pdf?src-supplier=Farnell, ComponentLink8Description=http://www.yageo.com/documents/recent/PYu-RC0603_51_RoHS_L_7.pdf?src-supplier=Future+Electronics, ComponentLink8URL=http://www.yageo.com/documents/recent/PYu-RC0603_51_RoHS_L_7.pdf?src-supplier=Future+Electronics, ComponentLink9Description=https://datasheet.octopart.com/RC0603FR-073KL-Yageo-datasheet-34211833.pdf?src-supplier=Element14, ComponentLink9URL=https://datasheet.octopart.com/RC0603FR-073KL-Yageo-datasheet-34211833.pdf?src-supplier=Element14, ComponentLink10Description=http://www.farnell.com/datasheets/1868787.pdf?src-supplier=Newark, ComponentLink10URL=http://www.farnell.com/datasheets/1868787.pdf?src-supplier=Newark, ComponentLink11Description=https://datasheet.octopart.com/RC0603FR-073KL-Yageo-datasheet-164759695.pdf?src-supplier=Future+Electronics, ComponentLink11URL=https://datasheet.octopart.com/RC0603FR-073KL-Yageo-datasheet-164759695.pdf?src-supplier=Future+Electronics, Construction=Rectangular, Depth=0.8mm, Features="Moisture Resistant", Item Type=Resistor, Lead Free=5697LeadFree, Length=1.6mm, Manufacturer Part Number=RC0603FR-073KL, Military Standard=Not, Number of Terminations=2, Packaging="Tape and Reel", Pins=2NUMBER, Power Rating=100mW, Reach SVHC Compliant=No, RoHS=Yes, RoHS Compliant=Yes, Series=RC, Supplier=Avnet, Termination=SMD/SMT, Tolerance=1%, Voltage Rating (DC)=50V, Width=800um
R14 R40 R66 R92: library part CRCW080510R0FKEAHP, "RES SMD 10 OHM 1% 1/2W 0805", Case Code (Imperial)=0805, Case Code (Metric)=2012, LCSC Part Number=C844598, Manufacturer=Vishay, Max Operating Temperature=155°C, Max Power Dissipation=333mW, Min Operating Temperature=-55°C, Package Quantity=5000, Power Rating=330mW, Ratings=AEC-Q200, Resistance Tolerance=1%, Resistor Type="Thick Film", Temperature Coefficient=100ppm/°C, Voltage Rating=150V, Case/Package=0805, ComponentLink1Description=http://www.farnell.com/datasheets/2884039.pdf?src-supplier=Newark, ComponentLink1URL=http://www.farnell.com/datasheets/2884039.pdf?src-supplier=Newark, ComponentLink2Description=https://datasheet.octopart.com/CRCW080510R0FKEAHP-Vishay-datasheet-87136057.pdf?src-supplier=Newark, ComponentLink2URL=https://datasheet.octopart.com/CRCW080510R0FKEAHP-Vishay-datasheet-87136057.pdf?src-supplier=Newark, ComponentLink3Description=http://www.vishay.com/docs/20043/crcwhpe3.pdf?src-supplier=Digikey, ComponentLink3URL=http://www.vishay.com/docs/20043/crcwhpe3.pdf?src-supplier=Digikey, Construction=Rectangular, Contact Plating=Tin, Depth=1.25mm, Features="Automotive AEC-Q200", Height=0.5mm, Item Type=Resistor, Lead Free="Lead Free", Length=2mm, Manufacturer Part Number=CRCW080510R0FKEAHP, Military Standard=Not, Number of Terminations=2, Packaging="Tape and Reel", Pricing="1=0.19, 10=0.066, 50=0.066, 100=0.04, 1000=0.027, 10000=0.023 (USD)", Radiation Hardening=No, Reach SVHC Compliant=Unknown, RoHS=Yes, RoHS Compliant=Yes, Series=CRCW-HP, Stock=384044, Supplier=Mouser, Technology="THICK FILM", Termination=SMD/SMT, Tolerance=1%, Voltage Rating (DC)=150V, Weight=0.000194oz, Width=1.2mm
R15 R41 R67 R93: library part RC0603FR-0724K3L, "RES 24.3K OHM 1% 1/10W 0603", Manufacturer=Yageo, Supplier Part Number=6938161, Voltage Rating (DC)=50V, ComponentLink1Description=https://datasheet.ciiva.com/15189/getdatasheetpartid-326710-15189669.pdf?src-supplier=Verical, ComponentLink1URL=https://datasheet.ciiva.com/15189/getdatasheetpartid-326710-15189669.pdf?src-supplier=Verical, Item Type=Resistors, Lead Free=5697LeadFree, Manufacturer Part Number=RC0603FR-0724K3L, Pricing="5000=0.0015, 50000=0.0014, 150000=0.0014, 375000=0.0013, 1000000=0.0012 (USD)", RoHS=Yes, Stock=440000, Supplier="Future Electronics"
R16 R42 R68 R94: library part CRCW0603100KFKEA, "RES SMD 100K OHM 1% 1/10W 0603", Case Code (Imperial)=0603, Case Code (Metric)=1608, Case/Package=345Case, LCSC Part Number=C844916, Max Operating Temperature=155°C, Min Operating Temperature=-55°C, Power Rating=100mW, Resistance Tolerance=1%, Resistor Type="Thick Film", Supplier Part Number=71-CRCW0603-100K-E3, Temperature Coefficient=100ppm/°C, Voltage Rating=75V, Category="Chip SMD Resistors", ComponentLink1Description=LCSC, ComponentLink2Description=http://www.farnell.com/datasheets/2310790.pdf?src-supplier=Farnell, ComponentLink2URL=http://www.farnell.com/datasheets/2310790.pdf?src-supplier=Farnell, ComponentLink3Description=https://datasheet.octopart.com/CRCW0603100KFKEA-Vishay-datasheet-14722531.pdf?src-supplier=Newark, ComponentLink3URL=https://datasheet.octopart.com/CRCW0603100KFKEA-Vishay-datasheet-14722531.pdf?src-supplier=Newark, ComponentLink4Description=https://www.vishay.com/docs/20035/dcrcwe3.pdf?src-supplier=Digi-Key, ComponentLink4URL=https://www.vishay.com/docs/20035/dcrcwe3.pdf?src-supplier=Digi-Key, ComponentLink5Description=https://datasheet.octopart.com/CRCW0603100KFKEA-Vishay-datasheet-5300368.pdf?src-supplier=Future+Electronics, ComponentLink5URL=https://datasheet.octopart.com/CRCW0603100KFKEA-Vishay-datasheet-5300368.pdf?src-supplier=Future+Electronics, ComponentLink6Description=http://www.farnell.com/datasheets/2310790.pdf?src-supplier=Newark, ComponentLink6URL=http://www.farnell.com/datasheets/2310790.pdf?src-supplier=Newark, ComponentLink7Description=http://www.farnell.com/datasheets/2310790.pdf?src-supplier=Element14, ComponentLink7URL=http://www.farnell.com/datasheets/2310790.pdf?src-supplier=Element14, ComponentLink8Description=https://datasheet.octopart.com/CRCW0603100KFKEA-Vishay-datasheet-83961561.pdf?src-supplier=Element14, ComponentLink8URL=https://datasheet.octopart.com/CRCW0603100KFKEA-Vishay-datasheet-83961561.pdf?src-supplier=Element14, ComponentLink9Description=https://datasheet.octopart.com/CRCW0603100KFKEA-Vishay-datasheet-8363642.pdf?src-supplier=Verical, ComponentLink9URL=https://datasheet.octopart.com/CRCW0603100KFKEA-Vishay-datasheet-8363642.pdf?src-supplier=Verical, ComponentLink10Description=https://datasheet.octopart.com/CRCW0603100KFKEA-Vishay-datasheet-508714.pdf?src-supplier=Farnell, ComponentLink10URL=https://datasheet.octopart.com/CRCW0603100KFKEA-Vishay-datasheet-508714.pdf?src-supplier=Farnell, ComponentLink11Description=https://datasheet.octopart.com/CRCW0603100KFKEA-Vishay-datasheet-17834126.pdf?src-supplier=TME, ComponentLink11URL=https://datasheet.octopart.com/CRCW0603100KFKEA-Vishay-datasheet-17834126.pdf?src-supplier=TME, Features=6309FeaturesType, Height=500um, Item Type=Resistor, Lead Free=5697LeadFree, Packaging=13Packaging, Pins=2NUMBER, Pricing="1=0.1, 10=0.019, 50=0.019, 100=0.009, 1000=0.007, 10000=0.004 (USD)", RoHS=Yes, RoHS Compliant=Yes, Stock=716604, Supplier=Mouser, Tolerance=1%, Voltage Rating (DC)=75V
R17 R25 R43 R51 R69 R77 R95 R103: library part RC0603FR-07390KL, "RES 390K OHM 1% 1/10W 0603", Case Code (Imperial)=0603, Case Code (Metric)=1608, LCSC Part Number=C137735, Manufacturer=Yageo, Max Operating Temperature=155°C, Max Power Dissipation=100mW, Min Operating Temperature=-55°C, Resistance Tolerance=1%, Resistor Type="Thick Film", Temperature Coefficient=100ppm/°C, Voltage Rating=50V, Working Voltage=75V, Case/Package=0603, ComponentLink1Description=https://datasheet.ciiva.com/11819/0900766b80f96399-11819357.pdf?src-supplier=Rs, ComponentLink1URL=https://datasheet.ciiva.com/11819/0900766b80f96399-11819357.pdf?src-supplier=Rs, ComponentLink2Description=https://datasheet.ciiva.com/5557/rc0603-5557952.pdf?src-supplier=Mouser, ComponentLink2URL=https://datasheet.ciiva.com/5557/rc0603-5557952.pdf?src-supplier=Mouser, ComponentLink3Description=https://datasheet.ciiva.com/2454/pyu-r-int-thick-7-2454247.pdf?src-supplier=Digikey, ComponentLink3URL=https://datasheet.ciiva.com/2454/pyu-r-int-thick-7-2454247.pdf?src-supplier=Digikey, ComponentLink4Description=https://datasheet.ciiva.com/2454/pyu-r-int-thick-7-2454248.pdf?src-supplier=Digikey, ComponentLink4URL=https://datasheet.ciiva.com/2454/pyu-r-int-thick-7-2454248.pdf?src-supplier=Digikey, ComponentLink5Description=https://datasheet.ciiva.com/2454/pyu-r-int-thick-7-2454246.pdf?src-supplier=Digikey, ComponentLink5URL=https://datasheet.ciiva.com/2454/pyu-r-int-thick-7-2454246.pdf?src-supplier=Digikey, Construction=Rectangular, Depth=0.8mm, Features="Moisture Resistant", Height=0.45mm, Item Type=Resistor, Lead Free=5697LeadFree, Length=1.6mm, Manufacturer Part Number=RC0603FR-07390KL, Military Standard=Not, Number of Terminations=2, Packaging="Tape and Reel", Pins=2, Power Rating=100mW, Pricing="1=0.104, 25=0.011, 50=0.009, 100=0.006 (USD)", Reach SVHC Compliant=Unknown, RoHS=Yes, RoHS Compliant=Yes, Series=RC, Stock=3700, Supplier=Avnet, Technology="THICK FILM", Termination=SMD/SMT, Tolerance=1%, Voltage Rating (AC)=50V, Voltage Rating (DC)=50V, Width=0.8mm
R18 R19 R44 R45 R70 R71 R96 R97: library part RC0603FR-0775KL, "RES 75K OHM 1% 1/10W 0603", Case Code (Imperial)=0603, Case Code (Metric)=1608, LCSC Part Number=C114636, Manufacturer=Yageo, Max Operating Temperature=155°C, Max Power Dissipation=100mW, Min Operating Temperature=-55°C, Resistance Tolerance=1%, Resistor Type="Thick Film", Temperature Coefficient=100ppm/°C, Voltage Rating=50V, Case/Package=0603, ComponentLink1Description=https://datasheet.ciiva.com/11808/0900766b80f96399-11808100.pdf?src-supplier=Rs, ComponentLink1URL=https://datasheet.ciiva.com/11808/0900766b80f96399-11808100.pdf?src-supplier=Rs, ComponentLink2Description=https://datasheet.ciiva.com/15189/getdatasheetpartid-326733-15189816.pdf?src-supplier=Verical, ComponentLink2URL=https://datasheet.ciiva.com/15189/getdatasheetpartid-326733-15189816.pdf?src-supplier=Verical, ComponentLink3Description=https://datasheet.ciiva.com/2455/pyu-r-int-thick-7-2455324.pdf?src-supplier=Digikey, ComponentLink3URL=https://datasheet.ciiva.com/2455/pyu-r-int-thick-7-2455324.pdf?src-supplier=Digikey, ComponentLink4Description=https://datasheet.ciiva.com/2455/pyu-r-int-thick-7-2455325.pdf?src-supplier=Digikey, ComponentLink4URL=https://datasheet.ciiva.com/2455/pyu-r-int-thick-7-2455325.pdf?src-supplier=Digikey, ComponentLink5Description=https://datasheet.ciiva.com/2455/pyu-r-int-thick-7-2455323.pdf?src-supplier=Digikey, ComponentLink5URL=https://datasheet.ciiva.com/2455/pyu-r-int-thick-7-2455323.pdf?src-supplier=Digikey, ComponentLink6Description=https://datasheet.ciiva.com/46395/443971-46395017.pdf?src-supplier=Element14, ComponentLink6URL=https://datasheet.ciiva.com/46395/443971-46395017.pdf?src-supplier=Element14, Construction=Rectangular, Depth=0.8mm, Features="Moisture Resistant", Height=0.45mm, Item Type=Resistor, Lead Free=5697LeadFree, Length=1.6mm, Manufacturer Part Number=RC0603FR-0775KL, Military Standard=Not, Number of Terminations=2, Packaging="Tape and Reel", Pins=2NUMBER, Power Rating=100mW, Pricing="5000=0.0015, 75000=0.0015, 250000=0.0014, 750000=0.0013, 2500000=0.0012 (USD)", Reach SVHC Compliant=No, RoHS=Yes, RoHS Compliant=Yes, Series=RC, Stock=550000, Supplier="Future Electronics", Technology="THICK FILM", Termination=SMD/SMT, Tolerance=1%, Voltage Rating (DC)=50V
R20 R46 R72 R98: library part RC0603FR-07140KL, "RES 140K OHM 1% 1/10W 0603", LCSC Part Number=C185372, Manufacturer=Yageo, Voltage Rating (DC)=50V, ComponentLink1Description=https://datasheet.ciiva.com/2453/pyu-r-int-thick-7-2453916.pdf?src-supplier=Digikey, ComponentLink1URL=https://datasheet.ciiva.com/2453/pyu-r-int-thick-7-2453916.pdf?src-supplier=Digikey, ComponentLink2Description=https://datasheet.ciiva.com/2453/pyu-r-int-thick-7-2453917.pdf?src-supplier=Digikey, ComponentLink2URL=https://datasheet.ciiva.com/2453/pyu-r-int-thick-7-2453917.pdf?src-supplier=Digikey, ComponentLink3Description=https://datasheet.ciiva.com/2453/pyu-r-int-thick-7-2453918.pdf?src-supplier=Digikey, ComponentLink3URL=https://datasheet.ciiva.com/2453/pyu-r-int-thick-7-2453918.pdf?src-supplier=Digikey, Item Type=Resistor, Lead Free=5697LeadFree, Manufacturer Part Number=RC0603FR-07140KL, Pricing="5000=0.0015, 50000=0.0014, 150000=0.0014, 375000=0.0013, 1000000=0.0012 (USD)", RoHS=Yes, Stock=215000, Supplier="Future Electronics"
R21 R22 R47 R48 R73 R74 R99 R100: library part CSR1206FTR130, "500mW Thick Film Resistors ±100ppm/℃ ±1% 130mΩ 1206 Chip Resistor - Surface Mount ROHS", LCSC Part Number=C346779, Manufacturer="SEI(Stackpole Elec)", Package=1206, ComponentLink1Description=LCSC, ComponentLink1URL=https://www.lcsc.com/product-detail/Chip-Resistor-Surface-Mount_SEI-Stackpole-Elec-CSR1206FTR130_C346779.html, Item Type=Resistor, Manufacturer Part Number=CSR1206FTR130
R23 R24 R49 R50 R75 R76 R101 R102: library part RL1206FR-7W0R15L, "RES 0.15 OHM 1% 1/2W 1206", LCSC Part Number=C859925, Manufacturer=YAGEO, Package=1206, ComponentLink1Description=LCSC, ComponentLink1URL=https://www.lcsc.com/product-detail/Chip-Resistor-Surface-Mount_YAGEO-RL1206FR-7W0R15L_C859925.html, Item Type=Resistor, Manufacturer Part Number=RL1206FR-7W0R15L
R26 R52 R78 R104: library part RC0603FR-0749K9L, "RES 49.9K OHM 1% 1/10W 0603", Case Code (Imperial)=0603, Case Code (Metric)=1608, LCSC Part Number=C114624, Manufacturer=Yageo, Max Operating Temperature=155°C, Max Power Dissipation=100mW, Min Operating Temperature=-55°C, Package Quantity=1, Resistance=49.9kR, Resistor Type="Thick Film", Supplier Part Number 1=311-49.9KHRCT-ND, Temperature Coefficient=100ppm/°C, Tolerance=1%, Voltage Rating=50V, Case/Package=0603, Category="Chip SMD Resistors", ComponentLink1Description=https://datasheet.ciiva.com/2454/pyu-r-int-thick-7-2454042.pdf?src-supplier=Digi-Key, ComponentLink1URL=https://datasheet.ciiva.com/2454/pyu-r-int-thick-7-2454042.pdf?src-supplier=Digi-Key, ComponentLink2Description=https://datasheet.ciiva.com/2454/pyu-r-int-thick-7-2454043.pdf?src-supplier=Digi-Key, ComponentLink2URL=https://datasheet.ciiva.com/2454/pyu-r-int-thick-7-2454043.pdf?src-supplier=Digi-Key, ComponentLink3Description=https://datasheet.ciiva.com/2454/pyu-r-int-thick-7-2454044.pdf?src-supplier=Digi-Key, ComponentLink3URL=https://datasheet.ciiva.com/2454/pyu-r-int-thick-7-2454044.pdf?src-supplier=Digi-Key, ComponentLink4Description=https://datasheet.ciiva.com/15189/getdatasheetpartid-323805-15189749.pdf?src-supplier=Verical, ComponentLink4URL=https://datasheet.ciiva.com/15189/getdatasheetpartid-323805-15189749.pdf?src-supplier=Verical, Construction=Rectangular, Depth=0.8mm, Features="Moisture Resistant", Height=0.022inch, Item Type=Resistor, Lead Free="Lead Free", Length=0.063inch, Manufacturer Part Number=RC0603FR-0749K9L, Military Standard=Not, Mount="Surface Mount", Number of Terminations=2, Packaging="Tape and Reel", Power Rating=100mW, Pricing 1="1=0.10000, 10=0.02400, 100=0.00970, 1000=0.00436, 2500=0.00378 (USD)", RoHS=Yes, RoHS Compliant=Yes, Series=RC, Size Code=0603, Stock 1=77863, Supplier 1=Digi-Key, Termination=SMD/SMT, Voltage Rating (DC)=50V, Width=0.031inch